# Altium PCB baidoxe.PcbDoc
Units mil, origin at the board's own origin, x right, y up, seen from the top; angles counter-clockwise.
Board outline 4900 x 4040 mil, 2 copper layers (Top Layer, Bottom Layer); 41 components, 41 nets, 165 pads, 11 vias.
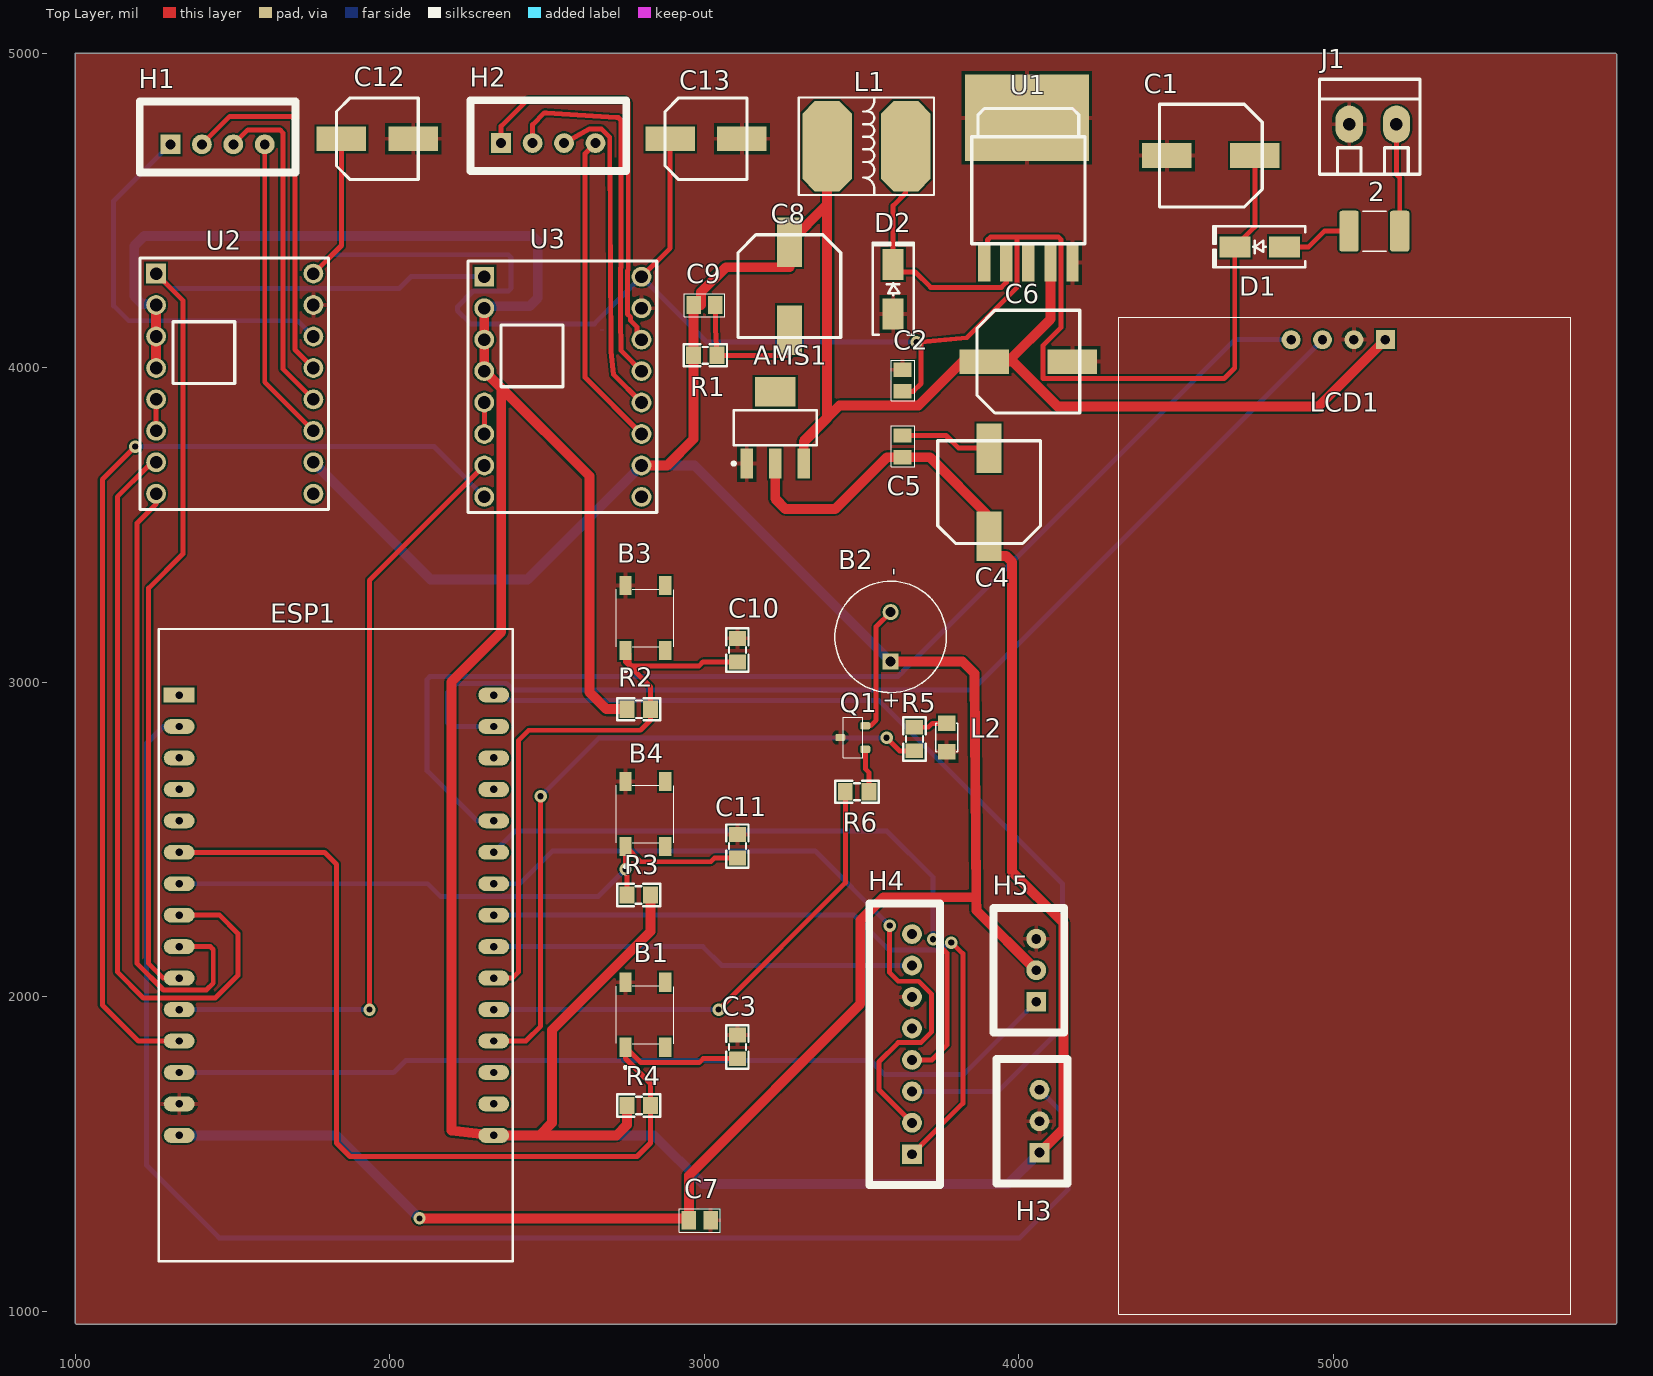
[diagram p0: Top Layer view]
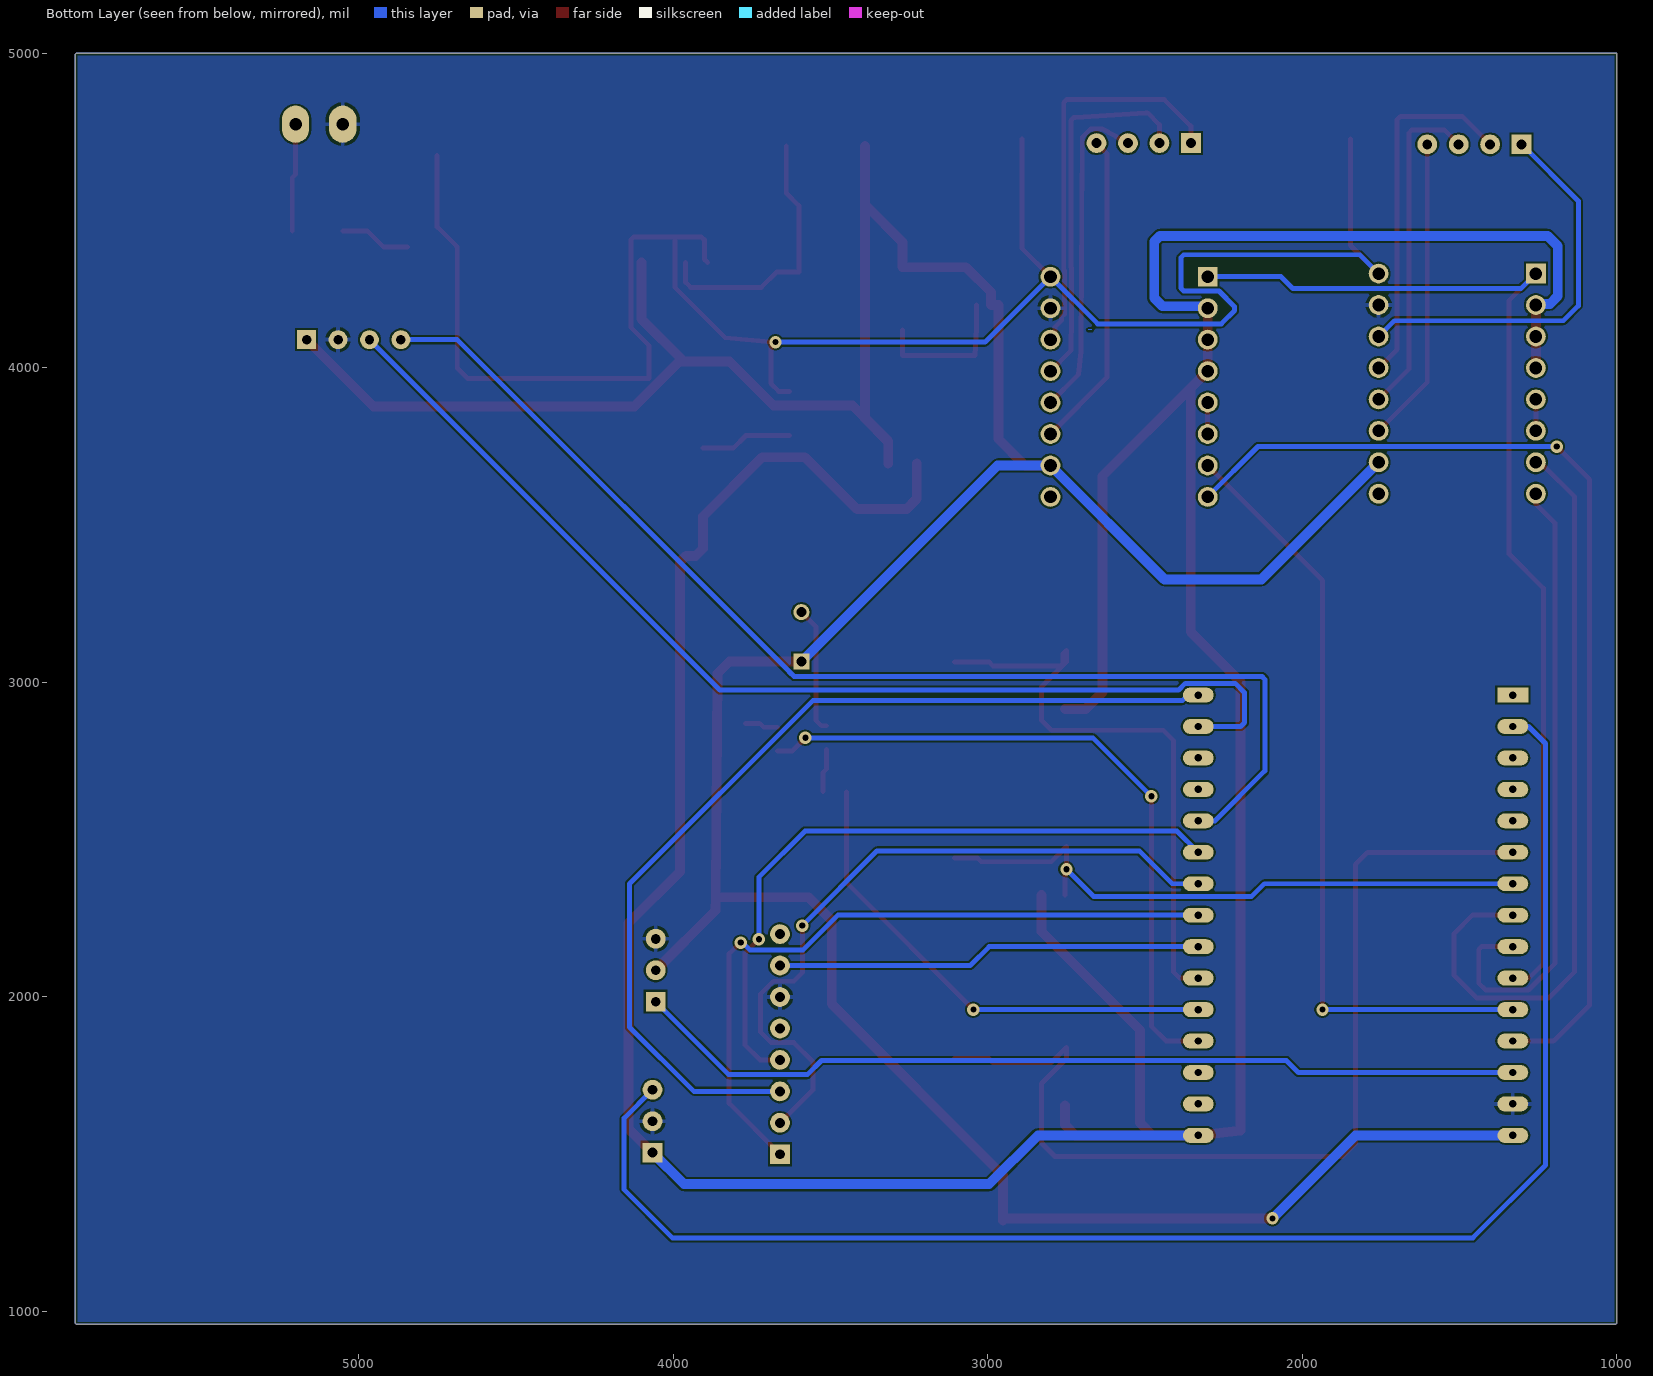
[diagram p1: Bottom Layer view, seen from below]

## Layer stack, top to bottom
Top Solder: solder mask 0.4, Solder Resist, Dk 3.5
Top Layer: signal copper 1.4
Dielectric 1: dielectric 12.6, FR-4, Dk 4.8
Bottom Layer: signal copper 1.4
Bottom Solder: solder mask 0.4, Solder Resist, Dk 3.5

## Board outline
1000,962.31 1002.31,960 5897.69,960 5900,962.31 5900,4997.69 5897.69,5000 1000,5000

## Design rules (kind name [scope] priority, off if disabled: settings)
Clearance Clearance_HighPower [InNet('BAT+') OR InNet('BAT-') OR InNet('LOAD+') OR InNet('NetQ1_2') OR InNet('NetJ3_1') vs InNet('GND')] p1: gap=39.37 ignorepadtopadclearanceinfootprint=FALSE
Clearance Clearance_1 [All] p2: gap=5.91 ignorepadtopadclearanceinfootprint=FALSE
PolygonConnect [All] p1: connectstyle=Relief reliefconductorwidth=13.78 reliefentries=4 polygonreliefangle="90 Angle" airgapwidth=9.84
RoutingVias [All] p1: holewidth=19.68 width=39.37 viastyle="Through Hole" minholewidth=11.81 minwidth=23.62 maxholewidth=11.81 maxwidth=23.62
SolderMaskExpansion [All] p1: expansion=4 istentingtop=FALSE
SupplyNets "Schematic Supply Nets_4" [InNet('VCC')] p1: voltage=0.000
SupplyNets "Schematic Supply Nets_3" [InNet('+3V3')] p2: voltage=0.000
SupplyNets "Schematic Supply Nets_2" [InNet('GND')] p3: voltage=0.000
SupplyNets "Schematic Supply Nets" [InNet('+12V')] p4: voltage=0.000
Width Width_power [InNet('+12') OR InNet('VCC') OR InNet('+3V3') OR InNet('BAT+') OR InNet('BAT-') OR InNet('LOAD+')] p1: maxlimit=98.43 minlimit=7.87 preferedwidth=31.5
Width Width_1 [All] p2: maxlimit=31.5 minlimit=7.87 preferedwidth=15.75
30 further rules are at their usual default settings.

## Components (designator, comment, footprint, x,y, rotation, side; value= is the part's Value field where it differs from the comment)
2 "fuse-1812" FUSSC324X455X250-2N 5130,4435 r180 top (schematic designator F1)
AMS1 "AMS1117-3.3V" SOT223 3225,3810 r0 top value="AMS1117-3.3V SOT223"
B1 "BUTTON" SW_PTS_647_SN50_SMTR2_LFS 2812.01,1943.35 r90 top
B2 "Buzzer" BUZZER,5V,9mm 3591.83,3145 r90 top
B3 "BUTTON" SW_PTS_647_SN50_SMTR2_LFS 2812.01,3205 r90 top
B4 "BUTTON" SW_PTS_647_SN50_SMTR2_LFS 2812.01,2581.65 r90 top
C1 "470uF" "tu nhom 8 (f)" 4610,4675 r180 top
C2 "0.1uF 50V" CAP_SMD_0805_CERAMIC 3630,3960 r90 top
C3 "104" "tu 0805" 3105,1841.09 r90 top
C4 "220uF" "tu nhom 8 (f)" 3905,3605 r90 top
C5 "0.1uF 50V" CAP_SMD_0805_CERAMIC 3630,3750.55 r90 top
C6 "470uF" "tu nhom 8 (f)" 4030,4020 r0 top
C7 "0.1uF 50V" CAP_SMD_0805_CERAMIC 2985,1290 r0 top
C8 "220uF" "tu nhom 8 (f)" 3270,4260 r270 top
C9 "0.1uF 50V" CAP_SMD_0805_CERAMIC 3000,4200 r0 top
C10 "104" "tu 0805" 3105,3102.74 r90 top
C11 "104" "tu 0805" 3105,2479.39 r90 top
C12 "100uF" "tu nhom 6.3 (d)" 1960,4728.58 r0 top
C13 "100uF" "tu nhom 6.3 (d)" 3005,4728.58 r0 top
D1 "SS34" "DIODE SMA" 4765,4385 r180 top
D2 "SS34" "DIODE SMA" 3600,4250 r90 top
ESP1 "ESP32 DEVKIT" "ESP32 WROOM 32 KIT" 1330,2960 r0 top
H1 "Header 4P 2.54" XH2.54M-4 1302.02,4710.91 r0 top
H2 "Header 4P 2.54" XH2.54M-4 2353.56,4714.78 r0 top
H3 "IR LM393" XH2.54M-3 4065,1505 r90 top
H4 "RFID" XH2.54M-8 3660,1500 r90 top
H5 "Servo" XH2.54M-3 4055,1985 r90 top
J1 "KF128-2P" KF128-3.81-2P 5050,4775 r0 top
L1 "47uH SMD" "Cuon Cam 7x7x5" 3665,4705 r90 top
L2 "LED 0805" LED-0805-Red 3770,2870 r270 top
LCD1 "LCD1602" LCD1602+i2c 5165,4090 r180 top
Q1 "SS8050" "MOS-FET; SOT23" 3471.68,2825 r180 top
R1 "1k" "tro smd 0805"#1 3002.77,4037.61 r180 top
R2 "10k" "tro smd 0805"#2 2790.87,2915 r0 top
R3 "10k" "tro smd 0805"#2 2790.87,2324.4 r180 top
R4 "10k" "tro smd 0805"#2 2790.87,1655 r0 top
R5 "1k" "tro smd 0805"#1 3665,2820 r90 top
R6 "1k" "tro smd 0805"#1 3485,2655 r0 top
U1 "LM2576HVS 5.0V SMD" TO263-5 4030,4565 r0 top
U2 "A4988" A4988 1505,3950 r0 top
U3 "A4988" A4988 2548.42,3940 r0 top

## Footprints (in the part's own frame and the unit in brackets; to place one, negate y for a bottom-side part, rotate by r counter-clockwise, add the part's x,y. Pads: shape width x height; smd on the part's side, far side on the other; paste and mask are expansions set on the pad)
A4988 [mm]
  rect 1.6x1.6 hole 1.02 paste-2539.97 mask+0.05: 1(-6.31,8.89)
  round 1.6 hole 1.02 paste-2539.97 mask+0.05: 2(-6.31,6.35) 3(-6.31,3.81) 4(-6.31,1.27) 5(-6.31,-1.27) 6(-6.31,-3.81) 7(-6.31,-6.35) 8(-6.31,-8.89) 9(6.39,-8.89) 10(6.39,-6.35) 11(6.39,-3.81) 12(6.39,-1.27) 13(6.39,1.27) 14(6.39,3.81) 15(6.39,6.35) 16(6.39,8.89)
  silkscreen extent -7.62,-10.16 7.62,10.16, body extent -7.45,-10.13 7.51,10.19, height 5.7
BUZZER,5V,9mm [mm]
  rect 1.308x1.308 / inner round 1.308 / far side rect 1.308x1.308 hole 0.8: 1(-2,0)
  round 1.308 hole 0.8: 2(2,0)
  silkscreen extent -4.5,-4.5 4.5,4.5, body extent -4.5,-4.5 4.5,4.5, height 4.5
CAP_SMD_0805_CERAMIC [mm]
  rect 1.16x1.47 smd paste+0 mask+0.102: 1(-0.875,0) 2(0.875,0)
  silkscreen extent -1.65,-0.97 1.65,0.91, body extent -1,-0.63 1,0.63, height 0.88
"Cuon Cam 7x7x5" [mm] "Cuon Cam 7x7x5"
  oct 7.3x4 smd: 1(0,0.635) 2(0,6.985)
  silkscreen extent -3.94,-1.65 3.94,9.27, body extent -3.5,0.07 3.5,7.8, height 5.02
"DIODE SMA" [mm] "SMA"
  rect 2.5x1.7 smd: 1(-2,0) 2(2,0)
  silkscreen extent -3.68,-1.65 3.75,1.65, body extent -2.6,-1.37 2.6,1.37, height 2.4
"ESP32 WROOM 32 KIT" [mm]
  rect 2.5x1.2 hole 0.6: 1(0,0)
  oval 2.5x1.2 hole 0.6: 2(0,-2.54) 3(0,-5.08) 4(0,-7.62) 5(0,-10.16) 6(0,-12.7) 7(0,-15.24) 8(0,-17.78) 9(0,-20.32) 10(0,-22.86) 11(0,-25.4) 12(0,-27.94) 13(0,-30.48) 14(0,-33.02) 15(0,-35.56) 16(25.4,-35.56) 17(25.4,-33.02) 18(25.4,-30.48) 19(25.4,-27.94) 20(25.4,-25.4) 21(25.4,-22.86) 22(25.4,-20.32) 23(25.4,-17.78) 24(25.4,-15.24) 25(25.4,-12.7) 26(25.4,-10.16) 27(25.4,-7.62) 28(25.4,-5.08) 29(25.4,-2.54) 30(25.4,0)
  silkscreen extent -1.65,-45.72 26.92,5.33, body extent -1.65,-45.6 26.85,5.33, height 10.49
FUSSC324X455X250-2N [mm]
  rrect25% 1.56x3.29 smd: 1(-2.045,0) 2(2.045,0)
  silkscreen extent -0.94,-1.62 0.94,1.62, body extent -2.27,-1.62 2.27,1.62, height 2.5
KF128-3.81-2P [mm] "ÂÝ¶¤Ê½½ÓÏß¶Ë×Ó£¬½Å¾à3.81mm"
  oval 2.2x3 hole 1: 1(0,0) 2(3.81,0)
  silkscreen extent -2.41,-4.04 5.71,3.63, body extent -2.41,-3.83 5.71,3.57, height 8.55
LCD1602+i2c [mil] "LCD dipslay 16x2, 16 pin"
  rect 60x60 hole 30: 1(0,0)
  round 60 hole 30: 2(100,0) 3(200,0) 4(300,0)
  silkscreen extent -589,-71 848,3098, body extent -589,-71 848,3098, height 414
LED-0805-Red [mil]
  rect 50x55 smd: 1(0,0) 2(90,0)
  silkscreen extent 0,-35 90,35, body extent 5,-25 85,25, height 43
"MOS-FET; SOT23" [mm] "SS8050G"
  rrect50% 0.8x0.6 smd: 1(-1.01,0.95) 2(-1.01,-0.95) 3(1.01,0)
  silkscreen extent -0.79,-1.63 0.79,1.63, body extent -1.2,-1.45 1.2,1.45, height 1.16
SOT223 [mm]
  rect 1x2.4 smd: 1(-2.3,-2.9) 2(0,-2.9) 3(2.3,-2.9)
  rect 3.3x2.4 smd: 4(0,2.9)
  silkscreen extent -3.47,-3.02 3.35,1.4, body extent -3.25,-3.56 3.25,3.4, height 1.68
SW_PTS_647_SN50_SMTR2_LFS [mm]
  rect 1.55x1 smd: 1(-2.625,1.6) 2(2.625,1.6) 3(-2.625,-1.6) 4(2.625,-1.6)
  silkscreen extent -4.35,-2.31 2.34,2.34, body extent -3.25,-2.25 3.25,2.25, height 5
TO263-5 [mil] "TO263-5"
  rect 39.37x120 smd: 1(-140,-230) 2(-70,-230) 3(0,-230) 4(70,-230) 5(140,-230)
  rect 393.7x275.59 smd: 6(-5,230)
  silkscreen extent -180,-170 180,260, body extent -200,-242 200,310, height 180
"tro smd 0805"#1 [mm]
  rect 1.2x1.4 smd: 1(-0.946,-0.061) 2(0.954,-0.061)
  silkscreen extent -1.75,-0.97 1.75,0.84, body extent -1.56,-0.76 1.44,0.64, height 0.53
"tro smd 0805"#2 [mm]
  rect 1.2x1.4 smd: 1(-0.946,0) 2(0.954,0)
  silkscreen extent -1.75,-0.91 1.75,0.9, body extent -1.46,-0.7 1.54,0.7, height 0.53
"tu 0805" [mm] "Compoment SMD 80x50mil"
  rect 1.2x1.4 smd: 1(-0.946,-0.003) 2(0.954,-0.003)
  silkscreen extent -1.75,-0.89 1.75,0.89, body extent -1.01,-0.64 1.01,0.63, height 0.61
"tu nhom 6.3 (d)" [mm]
  rect 4x2 smd: 1(-2.9,0) 2(2.9,0)
  silkscreen extent -3.3,-3.3 3.3,3.3, body extent -3.8,-3.3 3.8,3.3, height 8
"tu nhom 8 (f)" [mm]
  rect 4x2 smd: 1(-3.55,0) 2(3.55,0)
  silkscreen extent -4.15,-4.15 4.15,4.15, body extent -4.85,-4.25 4.85,4.25, height 10.5
XH2.54M-3 [mm]
  rect 1.6x1.6 hole 0.8: 1(0,0)
  round 1.6 hole 0.8: 2(2.54,0) 3(5.08,0)
  silkscreen extent -2.48,-2.26 7.56,3.46, body extent -2.48,-2.26 7.56,3.48, height 6.91
XH2.54M-4 [mm]
  rect 1.6x1.6 hole 0.8: 1(0,0)
  round 1.6 hole 0.8: 2(2.54,0) 3(5.08,0) 4(7.62,0)
  silkscreen extent -2.48,-2.26 10.1,3.46, body extent -2.48,-2.26 10.1,3.48, height 6.91
XH2.54M-8 [mm]
  rect 1.6x1.6 hole 0.8: 1(0,0)
  round 1.6 hole 0.8: 2(2.54,0) 3(5.08,0) 4(7.62,0) 5(10.16,0) 6(12.7,0) 7(15.24,0) 8(17.78,0)
  silkscreen extent -2.48,-2.26 20.26,3.46, body extent -2.48,-2.26 20.26,3.48, height 6.91

## Part data
2: library part fuse-1812L300, "Polymeric PTC Resettable Fuse 24V 3 A Ih Surface Mount 1812 (4532 Metric), Concave", Package=None, Availability="In Stock", Check_prices=https://www.snapeda.com/parts/1812L300/24SLER/Littelfuse/view-part/?ref=eda, MF="Littelfuse Inc.", MP=1812L300/24SLER, Price=None, Purchase-URL=https://pricing.snapeda.com/search/part/1812L300/24SLER/?ref=eda, SnapEDA_Link=https://www.snapeda.com/parts/1812L300/24SLER/Littelfuse/view-part/?ref=snap
AMS1: library part "AMS1117 SMD", "Dán", Chung_Loai=Dán, Don_Vi=Con, Ma_Hang=MH000596
B1 B3 B4: library part "BUTTON_SMD, 0.05A, 12V", "Switch Tactile N.O. SPST Round Button Gull Wing 0.05A 12VDC 100000Cycles 1.77N SMD T/R", Contact Resistance=100mΩ, Insulation Resistance=100MΩ, Manufacturer="C&K Components", Manufacturer Part Number=PTS647SM50SMTR2LFS, Max Current Rating=50mA, Max Operating Temperature=70°C, Max Voltage Rating (DC)=12V, Min Operating Temperature=-40°C, Operating Force=2.26N, Supplier Part Number=108-PTS647SM50SMTR2LFSCT-ND, Category="Tactile Switches", ComponentLink1Description=https://datasheet.octopart.com:443/PTS647SM50SMTR2LFS-C%26K-Components-datasheet-180017464.pdf?src-supplier=IHS, ComponentLink1URL=https://datasheet.octopart.com:443/PTS647SM50SMTR2LFS-C%26K-Components-datasheet-180017464.pdf?src-supplier=IHS, ComponentLink2Description=https://datasheet.octopart.com:443/PTS647SM50SMTR2LFS-C%26K-Components-datasheet-117317067.pdf?src-supplier=Future+Electronics, ComponentLink2URL=https://datasheet.octopart.com:443/PTS647SM50SMTR2LFS-C%26K-Components-datasheet-117317067.pdf?src-supplier=Future+Electronics, ComponentLink3Description=https://datasheet.octopart.com:443/PTS647SM50SMTR2LFS-C%26K-Components-datasheet-145017121.pdf?src-supplier=Electro+Sonic, ComponentLink3URL=https://datasheet.octopart.com:443/PTS647SM50SMTR2LFS-C%26K-Components-datasheet-145017121.pdf?src-supplier=Electro+Sonic, ComponentLink4Description=https://datasheet.octopart.com:443/PTS-647-SM50-SMTR2-LFS-C%26K-Components-datasheet-119449707.pdf?src-supplier=RS+(Formerly+Allied+Electronics), ComponentLink4URL=https://datasheet.octopart.com:443/PTS-647-SM50-SMTR2-LFS-C%26K-Components-datasheet-119449707.pdf?src-supplier=RS+(Formerly+Allied+Electronics), ComponentLink5Description="LINK SP", ComponentLink5URL=https://www.digikey.vn/en/products/detail/c-k/PTS647SM50SMTR2-LFS/9649858, ComponentLink6Description="MADE BY", ComponentLink6URL=HOANGBEU, Electrical Life=100kcycles, Export Control Classification Number (ECCN) Code=EAR99, Harmonized Tariff Schedule (HTS) Code=8536.50.90.40, Height=2.9mm, Introduction Date=2019-06-11, Length=4.5mm, Lifecycle Status=Production, LINK MUA=https://linhkien.cxtvn.com/11090-nut-nhan-smd-4p-45x45x5mm-10c.html, LINK SP=https://www.digikey.vn/en/products/detail/c-k/PTS647SM50SMTR2-LFS/9649858, MADE BY=HOANGBEU, Number of Positions=1, Pricing="1=0.3, 10=0.257, 25=0.24, 100=0.2151, 250=0.19936, 500=0.18812 (USD)", REACH SVHC=Yes, RoHS=Compliant, Schedule B="8536509065, 8536509065|8536509065, 8536509065|8536509065|8536509065, 8536509065|8536509065|8536509065|8536509065", Stock=16284, Supplier=DigiKey, Termination=Solder, Throw Configuration=SPST
B2: library part "BUZZER, 5V, 9mmm", "Electromagnetic Buzzer", Frequency=2.73kHz, Manufacturer=Soberton, Manufacturer Part Number=GT-0905A, Max Operating Temperature=60°C, Min Operating Temperature=-20°C, Operating Supply Current=80mA, Supplier Part Number=433-1033-ND, Voltage Rating=5V, Category="Audio Products", ComponentLink1Description=https://datasheet.octopart.com:443/GT-0905A-Soberton-datasheet-189107844.pdf?src-supplier=Master+Electronics, ComponentLink1URL=https://datasheet.octopart.com:443/GT-0905A-Soberton-datasheet-189107844.pdf?src-supplier=Master+Electronics, ComponentLink2Description="LINK MUA", ComponentLink2URL=https://linhkien.cxtvn.com/3372-coi-chip-3512v-tmb09a05-9x5mm.html, ComponentLink3Description="MADE BY", ComponentLink3URL=HOANGBEU, Height=4.5mm, Lead Free="Lead Free", Mounting Technology="Through Hole", Packaging="Tape & Reel (TR)", Pricing="1=1.27, 10=0.958, 25=0.8608, 50=0.7954, 100=0.7361, 250=0.66588, 500=0.61822, 1000=0.57471, 5000=0.48747 (USD)", RoHS=Compliant, Sensing Method=Magnetic, Stock=37843, Supplier=DigiKey, Termination="PC Pins"
C1 C4 C6 C8: library part "Tu Nhom 470uF 16V", "Dán", Chung_Loai=Dán, Don_Vi=Con, Ma_Hang=MH001940, So_Chan=2, Ten_Linh_Kien="Tụ Nhôm 470uF 16V 8x10.4MM"
C2 C5 C7 C9: library part "CAP_SMD_Cera, 0.1uF, 10%, 50V, 0805", "0.1 (104) µF ±10% 50V Ceramic Capacitor X7R 0805 (2012 Metric)", Capacitance=100nF, Case Code (Imperial)=0805, Case Code (Metric)=2012, Dielectric=X7R, Insulation Resistance=100GR, Manufacturer Cross=Yageo, Manufacturer Part Number=CC0805KRX7R9BB104, Max Operating Temperature=125°C, Min Operating Temperature=-55°C, Package Quantity=4000, Supplier Part Number 1=311-1140-1-ND, Tolerance=10%, Voltage=50V, Case/Package=0805, Category="Ceramic Capacitors", ComponentLink1Description=https://datasheet.ciiva.com/46393/1734573-46393307.pdf?src-supplier=Element14, ComponentLink1URL=https://datasheet.ciiva.com/46393/1734573-46393307.pdf?src-supplier=Element14, ComponentLink2Description=https://datasheet.ciiva.com/155/mlccorderingcode-155930.pdf?src-supplier=Digikey, ComponentLink2URL=https://datasheet.ciiva.com/155/mlccorderingcode-155930.pdf?src-supplier=Digikey, ComponentLink3Description=https://datasheet.ciiva.com/29242/445210-da-01-en-kerko-chip-0805-x7r-0-1uf-10proz-50vg-29242074.pdf?src-supplier=Conrad, ComponentLink3URL=https://datasheet.ciiva.com/29242/445210-da-01-en-kerko-chip-0805-x7r-0-1uf-10proz-50vg-29242074.pdf?src-supplier=Conrad, ComponentLink4Description="Link Cross", ComponentLink4URL=https://www.lcsc.com/product-detail/Multilayer-Ceramic-Capacitors-MLCC-SMD-SMT_YAGEO-CC0805KRX7R9BB104_C49678.html?s_z=n_CC0805KRX7R9BB104, ComponentLink5Description="Link Viet Nam", ComponentLink5URL=https://linhkien.cxtvn.com/1976-tu-khong-phan-cuc-0805.html, ComponentLink6Description="Link Original", ComponentLink6URL=https://www.digikey.com/en/products/detail/yageo/CC0805KRX7R9BB104/302874, Depth=1.25mm, Halogen Free=5694HalogenFree, Height=0.85mm, Lead Free=5697LeadFree, Length=2mm, LIBRARY MADE BY="MR. XUAN SIEU", Material=Ceramic, Mount="Surface Mount", Number of Pins=2, Packaging="Tape and Reel", Pricing 1="1=0.08, 10=0.032, 100=0.026, 1000=0.02, 4000=0.0176, 8000=0.01595, 12000=0.01512, 20000=0.0142, 28000=0.01367, 40000=0.01315, 100000=0.01202, 200000=0.01134, 400000=0.01077 (USD)", Radiation Hardening=No, Reach SVHC Compliant=No, RoHS=Yes, RoHS Compliant=Yes, Series=CC, Stock 1=3664790, Supplier 1=Digikey, Termination=SMD/SMT, Voltage Rating=50V
C3 C10 C11: library part "Tu 0805 104 50V 10%", "Dán", Chung_Loai=Dán, Don_Vi=Con, Ma_Hang=MH004551, So_Chan=2, Ten_Linh_Kien="Tụ 0805 104-100nF 10% 50V"
C12 C13: library part "Tu Nhom 100uF 16V", "Dán", Chung_Loai=Dán, Don_Vi=Con, Ma_Hang=MH002219, So_Chan=2, Ten_Linh_Kien="Tụ Nhôm 100uF 16V 6.3x5.4MM"
D1 D2: library part "Diode SS34 ( 1N5822 )", "Dán", Chung_Loai=Dán, Don_Vi=Con, Ma_Hang=MH002104, Ten_Linh_Kien="Diode SS34 3A 40V SMA ( 1N5822 SS34A)"
ESP1: library part "ESP32 WROOM 32 KIT_1", "Bảng Mạch Phát Triển WiFi Bluetooth Esp32", Datasheet=https://documentation.espressif.com/esp32-wroom-32_datasheet_en.pdf, Designer=Kata, Link Vietnam=https://shopee.vn/product/578443443/13742226706?d_id=3c2cb&uls_trackid=56tnvmar01un&utm_content=dRt74n3cjNaVUMxz7zAFb97c8p7
H1 H2: "Cắm Đực Thẳng", Chung_Loai=Cắm, Don_Vi=Con, Ma_Hang=MH001285, Ten_Linh_Kien="Header 4P XH2.54-4P Đực Thẳng"
H3 H5: library part "Header 3P 2.54", Chung_Loai=Cắm, Don_Vi=Con, Ma_Hang=MH001292, Ten_Linh_Kien="Header 3P XH2.54-3P Đực Thẳng"
H4: library part "Header 8P 2.54", Chung_Loai=Cắm, Don_Vi=Con, Ma_Hang=MH003366, Ten_Linh_Kien="Header 8P XH2.54-8P Đực Thẳng"
L1: library part "CUON CAM 47uH SMD", "Dán", Chung_Loai=Dán, Don_Vi=Con, Ma_Hang=MH004211, Ten_Linh_Kien="Cuộn Cảm 47uH 7x7x4MM CD74R"
L2: library part "LED 0805 Do", "Dán", Chung_Loai=Dán, Don_Vi=Con, Ma_Hang=MH000897, Ten_Linh_Kien="LED 0805 Màu Đỏ (Red)"
LCD1: library part LCD1602+i2c, "LCD 1602 Xanh Lá", Datasheet=https://www.alldatasheet.com/html-pdf/1574132/CRYSTAIFONTZ/LCD-1602A/1009/1/LCD-1602A.html, Designer=Kata, Link Vietnam=https://linhkienchatluong.vn/urllcd1602/lcd1602-5v-16x2-xanh-duong_sp2000_ct3888.aspx
Q1: library part TRANSISTOR_SS8050, "TRANS NPN 25V 1.5A SOT23-3 / Bipolar (BJT) Transistor NPN 25 V 1.5 A 100MHz 300 mW Surface Mount SOT-23-3", Case/Package=TO-236-3, Collector Base Voltage (VCBO)=40V, Collector Emitter Breakdown Voltage=25V, Collector Emitter Saturation Voltage=500mV, Emitter Base Voltage (VEBO)=5V, Manufacturer=Comchip, Manufacturer Part Number=SS8050-G, Max Collector Current=1.5A, Max Junction Temperature (Tj)=150°C, Max Power Dissipation=300mW, Supplier Part Number=641-1790-1-ND, Transition Frequency=100MHz, Category=BJTs, Collector Emitter Voltage (VCEO)=25V, ComponentLink1Description=https://datasheet.octopart.com:443/SS8050-G-Comchip-datasheet-180131983.pdf?src-supplier=IHS, ComponentLink1URL=https://datasheet.octopart.com:443/SS8050-G-Comchip-datasheet-180131983.pdf?src-supplier=IHS, ComponentLink2Description=https://datasheet.octopart.com:443/SS8050-G-Comchip-datasheet-155422643.pdf?src-supplier=Upverter, ComponentLink2URL=https://datasheet.octopart.com:443/SS8050-G-Comchip-datasheet-155422643.pdf?src-supplier=Upverter, ComponentLink3Description=https://datasheet.octopart.com:443/SS8050-G-Comchip-datasheet-189767092.pdf?src-supplier=LCSC, ComponentLink3URL=https://datasheet.octopart.com:443/SS8050-G-Comchip-datasheet-189767092.pdf?src-supplier=LCSC, ComponentLink4Description="LINK SP", ComponentLink4URL=https://www.digikey.com/en/products/detail/evvo/SS8050/21407173, ComponentLink5Description="MADE BY", ComponentLink5URL=HOANGBEU, Height=1.15mm, hFE Min=40, Lifecycle Status=Production, LINK MUA=https://linhkien.cxtvn.com/6446-mmss8050-l-tp-transistor-npn-25v-15a-sot-23-5c.html, LINK SP=https://www.digikey.com/en/products/detail/evvo/SS8050/21407173, MADE BY=HOANGBEU, Max Breakdown Voltage=25V, Max Operating Temperature=150°C, Mounting Technology="Surface Mount", Number of Elements=1, Number of Terminals=3, Power Dissipation=300mW, Pricing="1=0.26, 10=0.157, 100=0.0976, 500=0.0716, 1000=0.06315 (USD)", REACH SVHC=Yes, RoHS=Compliant, Schedule B=8541100070|8541100070|8541100070|8541100070|8541100070, Supplier=DigiKey
R1 R5 R6: library part "Tro 0805 1% 1k", "Dán", Chung_Loai=Dán, Don_Vi=Con, Ma_Hang=MH005468, So_Chan=2, Ten_Linh_Kien="Trở 0805 1% 1k"
R2 R3 R4: library part "Tro 0805 1% 10k", "Dán", Chung_Loai=Dán, Don_Vi=Con, Ma_Hang=MH005473, So_Chan=2, Ten_Linh_Kien="Trở 0805 1% 10k"
U1: "Dán", Chung_Loai=Dán, Don_Vi=Con, Ma_Hang=MH002362, Ten_Linh_Kien="LM2576HVS-5.0V BUCK 5V 3A TO263-5"
U2 U3: Datasheet=https://www.alldatasheet.com/datasheet-pdf/pdf/455036/ALLEGRO/A4988.html, Designer=Kata, Link origin="https://grabcad.com/library/a4988-stepper-driver-with-pins-socketed-1, https://easyeda.com/editor#id=!b21f460f337c435d854d954092ca6a03|!253cdfaaa9784aa9ac4f75afb905f3ce", Link Vietnam=https://linhkienchatluong.vn/urlmodule-dieu-khien-dong-co/module-dieu-khien-dong-co-buoc-a4988_sp496_ct6114.aspx

## Via types
v1: diameter 39.37, hole 19.68, Top Layer to Bottom Layer, 11 vias

## Nets (pads, with @x,y where several pads share a name; then routed paths per layer and width w, separated by ;. In a path a pad name is that pad's centre, name@x,y a point inside that pad or via, vN(x,y) a via of type N, cw(c..) or ccw(c..) an arc to the next point about the centre after c; other vN are vias at no path point)
+3V3: AMS1.2 C4.1 C5.1 ESP1.16 H3.1 R2.1 R3.1 R4.1 U2.2 U2.3 U2.4 U3.2 U3.3 U3.4 | length 12542.6
  Top Layer w31.5: U2.4 U2.3 U2.2 ; U3.2 U3.3 U3.4 2354,3936 ; R4.1 2753.65,1593.65 2720,1560 2475,1560 ; R2.1 2688,2915 2634,2969 2634,3656 2354,3936 ; R3.1 2828.1,2208 2515,1894.9 2515,1600 2475,1560 ; AMS1.2 3225,3584 3257,3552 3415.9,3552 3580,3716.1 C5.1 3717,3716.1 3905,3528.1 3905,3425.87 3928.62,3402.24 3959.36,3402.24 3977.81,3383.79 3977.81,2398.19 4141,2235 4141,1581 H3.1 ; 2354,3936 2354,3160 2195.15,3001.15 2195.15,1575.19 ESP1.16 2475,1560
  Bottom Layer w31.5: U2.2 1253.03,4203.55 1211.76,4203.55 1186.96,4228.35 1186.96,4387.24 1219.84,4420.11 2451.49,4420.11 2469.94,4401.66 2469.94,4221.86 2444.11,4196.03 2306.03,4196.03 U3.2 ; ESP1.16 2840,1560 2995,1405 3965,1405 H3.1
+12V: C1.1 C2.1 C12.1 C13.1 D1.2 U1.1 U2.16 U3.16 | length 6384.6
  Top Layer w15.75: U2.16 1845.83,4389.25 C12.1 ; U3.16 2890.83,4380.82 C13.1 ; C2.1 3664,3925.55 3689,3950.55 v1@3689,4082 ; v1(3674,4082) v1@3689,4082 ; U1.1 3899.88,4344.88 3899.88,4406.77 3909.11,4416 3994,4416 ; C1.1 4749.76,4448.5 D1.2 4686,4385 4686,4000 4652,3966 4077,3966 4077,4072 4134,4129 4134,4408 4126,4416 3994,4416 ; v1@3689,4082 3834,4096 3994,4256 3994,4416
  Bottom Layer w15.75: U2.16 1816.36,4359.78 2376.37,4359.78 2385.6,4350.56 2385.6,4253.95 2376.37,4244.72 2264.28,4244.72 2214.59,4195.03 2214.59,4181.98 2256.57,4140 2650,4140 U3.16 3008,4082 v1(3674,4082)
BUZZER_CTRL: ESP1.20 R6.1 | length 1574.4
  Top Layer w15.75: v1(3045,1960) 3447.77,2362.77 R6.1
  Bottom Layer w15.75: ESP1.20 v1(3045,1960)
DIR_X: ESP1.12 U3.8 | length 3287.1
  Top Layer w15.75: v1(1190,3750) 1085.49,3645.49 1085.49,1974.31 1199.8,1860 ESP1.12
  Bottom Layer w15.75: v1(1190,3750) 2140,3750 U3.8
DIR_Z: ESP1.9 U2.8 | length 2023.9
  Top Layer w15.75: U2.8 1256.58,3567.58 1196.18,3507.18 1196.18,2105.82 1280,2022 1416.4,2022 1438.18,2043.78 1438.18,2150.78 1428.96,2160 ESP1.9
GND: AMS1.1 B1.2 B3.2 B4.2 C1.2 C2.2 C3.2 C6.2 C7.2 C10.2 C11.2 C12.2 C13.2 D2.1 ESP1.14 H3.2 H4.6 H5.3 J1.1 L2.2 LCD1.2 Q1.3 U1.5 U1.6 U2.15 U3.15
I2C_SCL: ESP1.29 LCD1.3 | length 3512.1
  Bottom Layer w15.75: ESP1.29 2194.92,2860 2182.96,2871.96 2182.96,2967.59 2212.77,2997.4 2371.08,2997.4 2392.26,2976.22 3851.22,2976.22 LCD1.3
I2C_SDA: ESP1.26 LCD1.4 | length 3763.3
  Bottom Layer w15.75: ESP1.26 2277,2560 2118.14,2718.86 2118.14,3009.71 2127.48,3019.06 2380.05,3019.06 2380.17,3018.94 3614.89,3018.94 3622.68,3026.73 3623.29,3026.73 3631.36,3034.8 3631.36,3035.41 4685.95,4090 LCD1.4
IR_GATE_IN: ESP1.2 H3.3 | length 4910.9
  Bottom Layer w15.75: ESP1.2 1280,2860 1225.92,2805.92 1225.92,1465.08 1457,1234 4002,1234 4155.17,1387.17 4155.17,1614.83 H3.3
LED_STATUS: ESP1.19 R5.1 | length 2182
  Top Layer w15.75: ESP1.19 2432,1860 2479,1907 v1(2479,2638) ; v1(3579,2824) 3620.23,2782.77 R5.1
  Bottom Layer w15.75: v1(2479,2638) 2665,2824 v1(3579,2824)
LIMIT_X_HOME: B3.1 C10.1 ESP1.21 R2.2 | length 1922.7
  Top Layer w15.75: ESP1.21 2389,2060 2409,2080 2409,2816 2441,2848 2796.45,2848 2828.45,2880 R2.2 2828.45,2986 2764.63,3049.82 2749.02,3065.43 B3.1 2760.14,3090.53 2760.14,3060.67 2767.81,3053 2983,3053 2995.51,3065.51 C10.1
LIMIT_Z_MAX: B4.1 C11.1 ESP1.7 R3.2 | length 2008.1
  Top Layer w15.75: R3.2 2753.3,2399 2749.02,2403.28 v1(2749.02,2406.13) B4.1 2797.32,2430 3020.45,2430 3032.61,2442.17 C11.1
  Bottom Layer w15.75: ESP1.7 2120,2360 2160,2320 2662.89,2320 v1(2749.02,2406.13)
LIMIT_Z_MIN: B1.1 C3.1 ESP1.6 R4.2 | length 3154.5
  Top Layer w15.75: ESP1.6 1792,2460 1830,2422 1830,1536 1873,1493 2785.45,1493 2828.45,1536 R4.2 2828.45,1725 2749.02,1804.43 B1.1 2798.02,1791 2983,1791 2995.86,1803.86 C3.1
M_X_1A: H2.3 U3.12 | length 1049
  Top Layer w15.75: H2.3 2634.81,4760.06 2672.32,4760.06 2698.84,4733.53 2702.8,4052.22 2710.55,3979.45 U3.12
M_X_1B: H2.4 U3.11 | length 1013.2
  Top Layer w15.75: H2.4 2620,4681.22 2620,3970 U3.11
M_X_2A: H2.2 U3.13 | length 1184.6
  Top Layer w15.75: H2.2 2453.56,4773.39 2491.16,4810.99 2498.21,4810.99 2720.49,4796.11 2726.39,4795.71 2730.57,4791.53 2735.19,4786.92 2735.19,4319.84 2733.07,4317.72 2733.07,4162.28 2735.19,4054.81 2739.8,4050.2 U3.13
M_X_2B: H2.1 U3.14 | length 1279.3
  Top Layer w15.75: H2.1 2353.56,4768.64 2437.98,4853.05 2748.39,4853.05 2757.62,4843.83 2757.62,4317.85 2757.62,4311.65 2754.72,4308.75 2754.72,4171.25 2765.25,4160.72 2765.25,4150.47 2785,4130.72 2785,4090 U3.14
M_Z_1A: H1.3 U2.12 | length 1068.5
  Top Layer w15.75: H1.3 1548.11,4757 1650.49,4757 1659.71,4747.77 1659.71,3996.86 U2.12
M_Z_1B: H1.4 U2.11 | length 974.9
  Top Layer w15.75: H1.4 1602.02,3954.56 U2.11
M_Z_2A: H1.2 U2.13 | length 1150.7
  Top Layer w15.75: H1.2 1491.11,4800 1687,4800 1697.74,4789.26 1697.74,4058.83 U2.13
M_Z_2B: H1.1 U2.14 | length 1263.4
  Bottom Layer w15.75: H1.1 1121.7,4530.59 1121.7,4197.49 1169.19,4150 1706.57,4150 U2.14
MOTORS_EN: ESP1.10 U2.1 U3.1 | length 3469.3
  Top Layer w15.75: U2.1 1341.65,4214.93 1341.65,3408.65 1233.08,3300.08 1233.08,2105.92 1279,2060 ESP1.10
  Bottom Layer w15.75: U2.1 1304.58,4252 2029,4252 2067,4290 U3.1
NetB2_2: B2.2 Q1.2 | length 404.6
  Top Layer w15.75: Q1.2 3528.4,2862.4 3546,2880 3546,3177.91 B2.2
NetC4_2: C4.2 C5.2 | length 291.7
  Top Layer w15.75: C5.2 3768,3785 3808.24,3744.76 C4.2
NetC8_2: C8.2 C9.2 R1.1 | length 470.4
  Top Layer w15.75: C9.2 3034.45,4125.55 R1.1 3270,4040 C8.2
NetD1_1: 2.2 D1.1 | length 226.5
  Top Layer w15.75: D1.1 4921,4385 4971,4435 2.2
NetD2_2: D2.2 L1.1 U1.2 | length 866.5
  Top Layer w15.75: L1.1 3640,4556 3600,4516 D2.2 3600,4305 3670,4305 3719,4256 3944,4256 3960,4272 U1.2
NetF1_1: 2.1 J1.2 | length 344.4
  Top Layer w15.75: J1.2 5200,4615.51 5210.51,4605 2.1
NetL2_1: L2.1 R5.2 | length 107.8
  Top Layer w15.75: R5.2 3712,2857.57 3724.43,2870 L2.1
NetQ1_1: Q1.1 R6.2 | length 139.6
  Top Layer w15.75: Q1.1 3511.44,2725.13 3522.57,2714 R6.2
NetU2_5: U2.5 U2.6 | length 100
  Top Layer w15.75: U2.6 U2.5
NetU3_5: U3.5 U3.6 | length 100
  Top Layer w15.75: U3.6 U3.5
RFID_MISO: ESP1.25 H4.4 | length 2167.5
  Top Layer w15.75: H4.4 3723.45,1800 3770.41,1846.97 3770.41,2139.98 v1(3726.93,2183.47)
  Bottom Layer w15.75: ESP1.25 2397.49,2527.49 3580.51,2527.49 3726.93,2381.07 v1(3726.93,2183.47)
RFID_MOSI: ESP1.30 H4.3 | length 3075.1
  Bottom Layer w15.75: ESP1.30 2362.96,2960 2380.56,2942.39 3555.49,2942.39 4138.2,2359.69 4138.2,1904.2 3934,1700 H4.3
RFID_RST: ESP1.22 H4.7 | length 1354.9
  Bottom Layer w15.75: ESP1.22 2995,2160 3055,2100 H4.7
RFID_SCK: ESP1.24 H4.2 | length 2275.1
  Top Layer w15.75: v1(3589,2227) 3589,2077 3616,2050 3681,2050 3721.16,2009.84 3721.16,1887.88 3688,1854.72 3616,1854.72 3555,1793.72 3555,1705 H4.2
  Bottom Layer w15.75: ESP1.24 2412.88,2360 2517.49,2464.61 3351.39,2464.61 v1(3589,2227)
RFID_SDA: ESP1.23 H4.1 | length 2266.1
  Top Layer w15.75: H4.1 3821.74,1661.74 3821.74,2137.83 3786.71,2172.86 v1(3784.86,2172.86)
  Bottom Layer w15.75: ESP1.23 3476,2260 3586,2150 3755.61,2150 3778.47,2172.86 v1(3784.86,2172.86)
SERVO_PWM: ESP1.13 H5.1 | length 2855.5
  Bottom Layer w15.75: ESP1.13 2012,1760 2050,1798 3528,1798 3573,1753 3823,1753 H5.1
STEP_X: ESP1.11 U3.7 | length 2486.2
  Top Layer w15.75: v1(1935,1960) 1935,3325 U3.7
  Bottom Layer w15.75: ESP1.11 v1(1935,1960)
STEP_Z: ESP1.8 U2.7 | length 2471
  Top Layer w15.75: U2.7 1243.79,3700 1227.38,3683.59 1226.53,3683.59 1133.19,3590.25 1133.19,2079.71 1216.19,1996.7 1288.22,1996.7 1288.92,1997.4 1445.41,1997.4 1516.81,2068.8 1516.81,2201.58 1458.38,2260 ESP1.8
VCC: AMS1.3 B2.1 C6.1 C7.1 C8.1 C9.1 ESP1.15 H5.2 L1.2 LCD1.1 R1.2 U1.4 U2.10 U3.10 | length 11778.4
  Top Layer w31.5: v1(2094,1296) C7.1@2950.55,1296 ; U3.10 2881.61,3690 2965.2,3773.59 R1.2 2965.2,4119 2965.55,4119.36 C9.1 2989,4200 2989,4241 3068,4320 3270,4320 C8.1 3390,4519.76 ; C7.1 C7.1@2950.55,1296 ; AMS1.3 3315.55,3765 ; L1.2 3390,4519.76 ; B2.1 3820,3066.26 3858,3028.26 3864.13,2316.98 ; H5.2 3864.49,2275.51 3864.13,2316.98 ; U1.4 4100,4155 C6.1@3965,4020 ; LCD1.1 4952,3877 4123,3877 3980,4020 C6.1@3965,4020 ; C7.1@2950.55,1296 2950.55,1432.55 3495.28,1977.28 3495.28,2243.01 3569.25,2316.98 3864.13,2316.98 ; 3315.55,3765 3315.55,3767 3390,3841.45 ; 3315.55,3765 3390,3839.45 3390,3841.45 ; 3390,3841.45 3390,4519.76 ; 3390,3841.45 3429.55,3881 3681,3881 3820,4020 C6.1 C6.1@3965,4020
  Bottom Layer w31.5: ESP1.15 1830,1560 v1(2094,1296) ; U2.10 2128.58,3328 2438,3328 U3.10 2968.09,3690 B2.1
pads on no net: AMS1.4 B1.3 B1.4 B3.3 B3.4 B4.3 B4.4 ESP1.1 ESP1.3 ESP1.4 ESP1.5 ESP1.17 ESP1.18 ESP1.27 ESP1.28 H4.5 H4.8 U1.3 U2.9 U3.9
copper on no net: | length 17885.9
  Bottom Layer w3.94: 2669,4121 2679,4121 ; 1000,962.31 1002.31,960 5897.69,960 5900,962.31 5900,4997.69 5897.69,5000 1000,5000 1000,962.31

## Polygon pours and split planes (outlines as drawn)
GND on Top Layer "GND_L01_P000" (solid, remove dead copper, pour order 0): 1000,5000 5900,5000 5900,960 1000,960
GND on Bottom Layer "GND_L02_P001" (solid, remove dead copper, pour order 1): 1000,5000 5897.69,5000 5898.85,4998.85 5898.85,961.15 1001.15,961.15

## Text inside footprints (layer, text, board x,y; h text height)
B2: Top Overlay "-" at 3620.53,3338.91 h50.14 r90; Top Overlay "+" at 3615.51,2913.31 h50.13 r90
LCD1: the flat protection "+" at 5040,2607 h60 r180
R2: Mechanical 15 "+" at 2786.54,2908.63 h19.68
R3: Mechanical 15 "+" at 2795.2,2330.77 h19.68 r180
R4: Mechanical 15 "+" at 2786.54,1648.63 h19.68
U2: the flat protection "+" at 1486,3918 h60
U3: the flat protection "+" at 2529.42,3908 h60